# Altium PCB PCB_SciKey_2026-11-08.pcbdoc
Units mm, origin at the board's own origin, x right, y up, seen from the top; angles counter-clockwise.
Board outline 113.54 x 85.6 mm, 2 copper layers (Top Layer, Bottom Layer); 29 components, 56 nets, 93 pads, 12 vias.
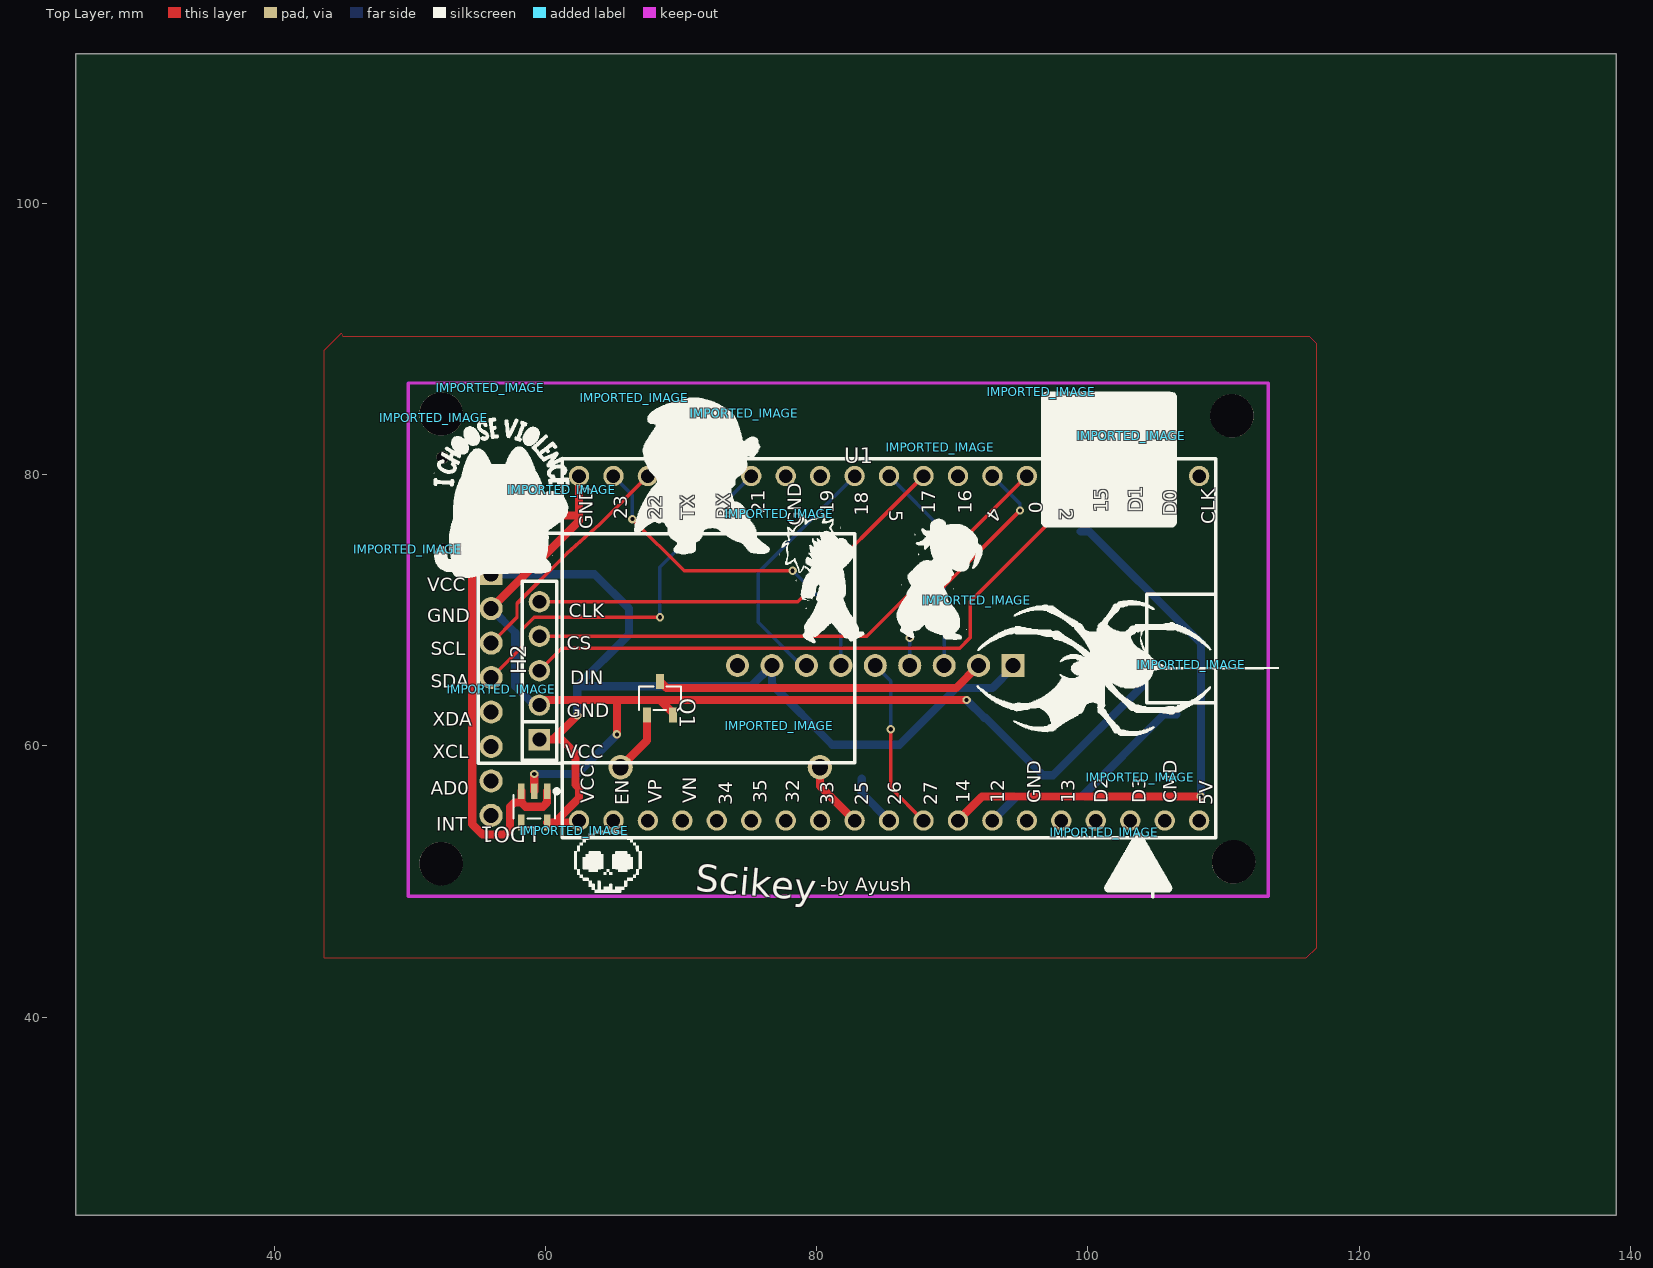
[diagram p0: Top Layer view]
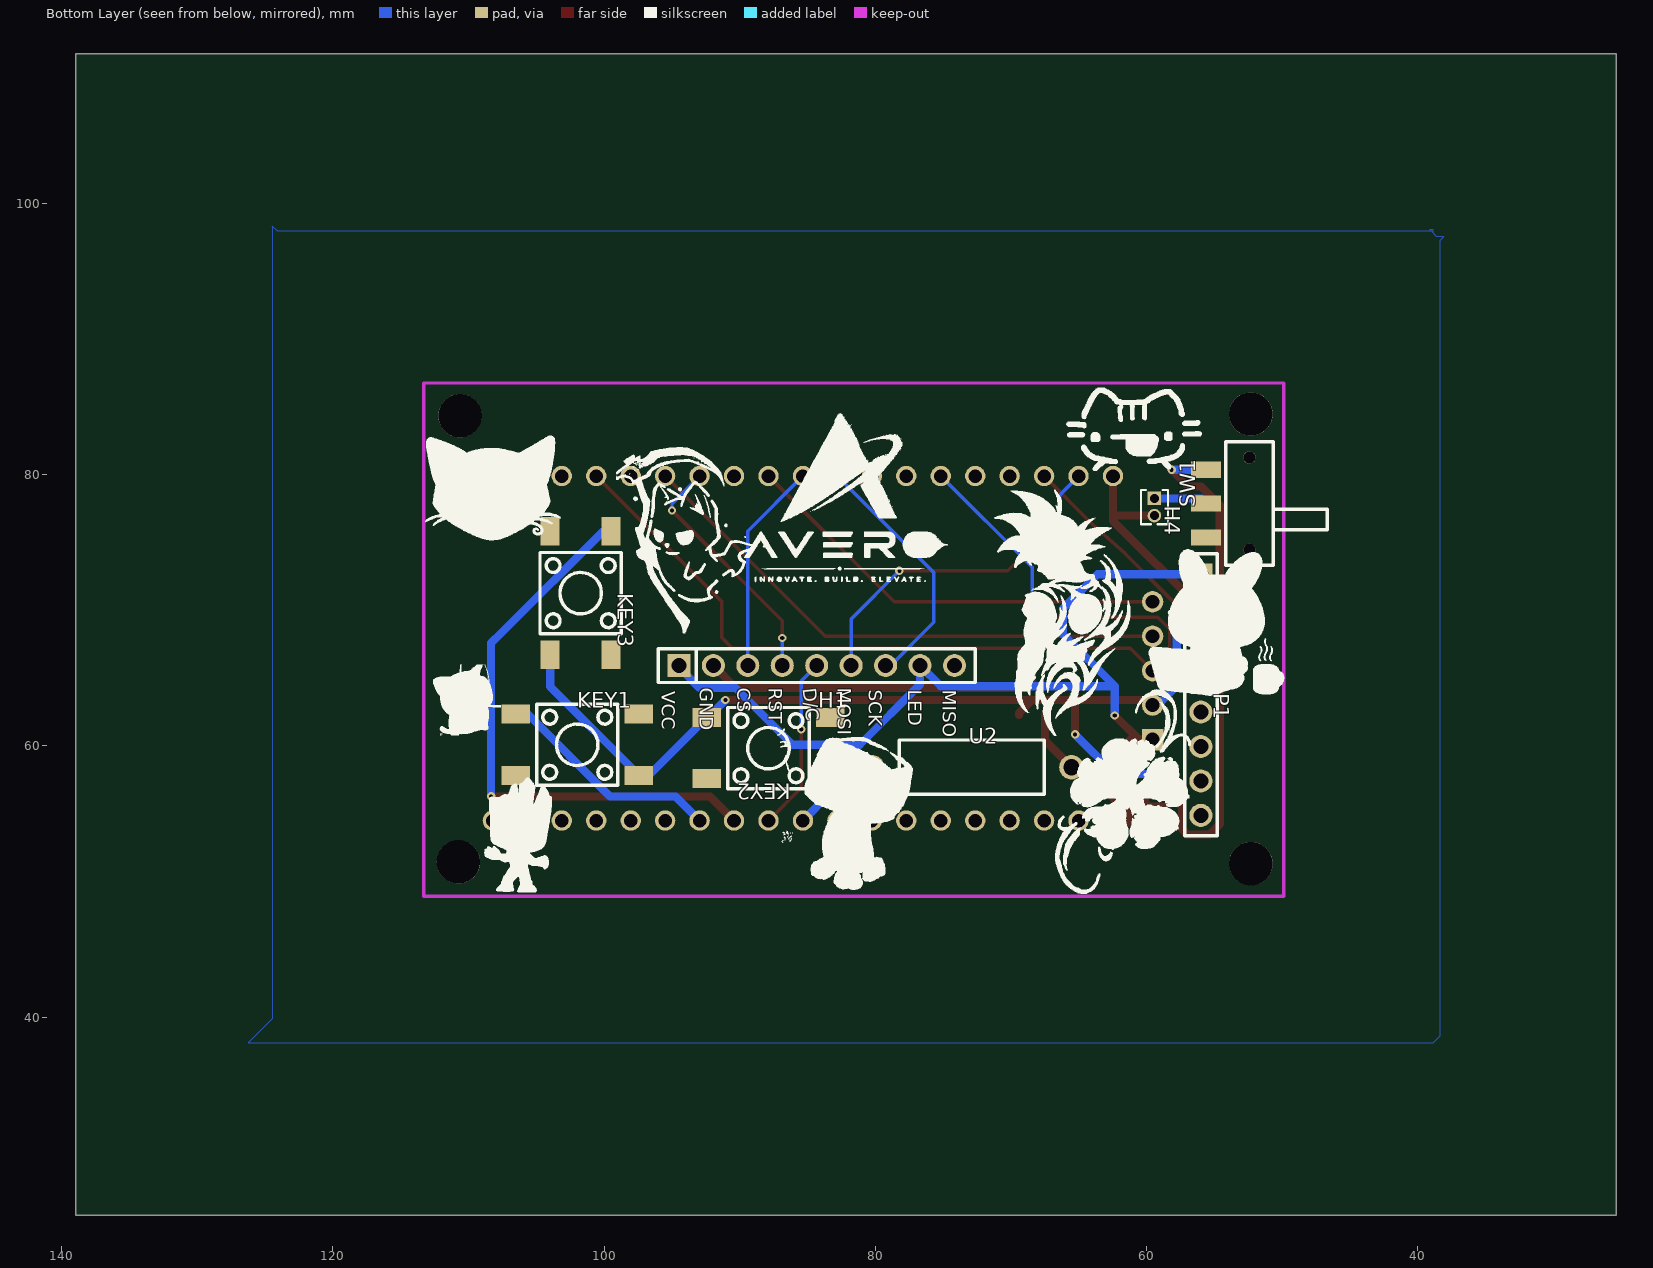
[diagram p1: Bottom Layer view, seen from below]

## Layer stack, top to bottom
Top Layer: signal copper (thickness not stored)
Dielectric: dielectric 0.32, FR-4, Dk 4.8
Bottom Layer: signal copper (thickness not stored)

## Board outline
138.938,25.4 25.4,25.4 25.4,110.998 138.938,110.998

## Components (designator, comment, footprint, x,y, rotation, side; value= is the part's Value field where it differs from the comment)
H1 "Header-Female-2.54_1x9" HDR-TH_9P-P2.54-V-F-1 84.328,65.913 r0 bottom
H2 "Header-Female-2.54_1x5" HDR-TH_5P-P2.54-V-F 59.563,65.532 r90 top
H4 "HX PZ1.27-1X2P ZZ" HDR-TH_HX-PZ1.27-1X2P-ZZ 59.436,77.597 r90 bottom
IMPORTED_IMAGE "IMPORTED_IMAGE" IMPORTED_IMAGE 74.66,84.495 r0 top
IMPORTED_IMAGE "IMPORTED_IMAGE" IMPORTED_IMAGE 61.218,78.877 r0 top
IMPORTED_IMAGE "IMPORTED_IMAGE" IMPORTED_IMAGE 89.106,81.996 r0 top
IMPORTED_IMAGE "IMPORTED_IMAGE" IMPORTED_IMAGE 103.204,82.856 r0 top
IMPORTED_IMAGE "IMPORTED_IMAGE" IMPORTED_IMAGE 55.932,86.383 r0 top
IMPORTED_IMAGE "IMPORTED_IMAGE" IMPORTED_IMAGE 56.764,64.15 r0 top
IMPORTED_IMAGE "IMPORTED_IMAGE" IMPORTED_IMAGE 49.864,74.474 r0 top
IMPORTED_IMAGE "IMPORTED_IMAGE" IMPORTED_IMAGE 77.256,61.475 r0 top
IMPORTED_IMAGE "IMPORTED_IMAGE" IMPORTED_IMAGE 107.609,65.982 r0 top
IMPORTED_IMAGE "IMPORTED_IMAGE" IMPORTED_IMAGE 103.851,57.67 r0 top
IMPORTED_IMAGE "IMPORTED_IMAGE" IMPORTED_IMAGE 91.804,70.712 r0 top
IMPORTED_IMAGE "IMPORTED_IMAGE" IMPORTED_IMAGE 77.249,77.1 r0 top
IMPORTED_IMAGE "IMPORTED_IMAGE" IMPORTED_IMAGE 51.77,84.19 r0 top
IMPORTED_IMAGE "IMPORTED_IMAGE" IMPORTED_IMAGE 96.549,86.101 r0 top
IMPORTED_IMAGE "IMPORTED_IMAGE" IMPORTED_IMAGE 66.541,85.664 r0 top
IMPORTED_IMAGE "IMPORTED_IMAGE" IMPORTED_IMAGE 62.119,53.73 r0 top
IMPORTED_IMAGE "IMPORTED_IMAGE" IMPORTED_IMAGE 101.213,53.608 r0 top
KEY1 "4PINTACTPCBTHTPUSHBUTTON" SW-SMD_4P-L6.0-W6.0-P4.50-LS10.0_TL3301EF160QG 101.981,60.071 r0 bottom
KEY2 "4PINTACTPCBTHTPUSHBUTTON" SW-SMD_4P-L6.0-W6.0-P4.50-LS10.0_TL3301EF160QG 87.884,59.817 r180 bottom
KEY3 "4PINTACTPCBTHTPUSHBUTTON" SW-SMD_4P-L6.0-W6.0-P4.50-LS10.0_TL3301EF160QG 101.727,71.247 r90 bottom
LDO1 "ME6211C33M5G-N" SOT-23-5_L3.0-W1.7-P0.95-LS2.8-BL 59.182,55.499 r180 top
P1 "Header-Female-2.54_1x8" HDR-TH_8P-P2.54-V-F 56.007,63.754 r90 bottom
Q1 "MMBT7002" SOT-23-3_L2.9-W1.6-P1.90-LS2.8-BR 68.453,63.5 r270 top
SW1 "MST-12D18G3 SURFACE MOUNT SLIDE SWITCH" SW-SMD_MST-12D18G4-SPDT-SLIDE-SWITCH 55.626,77.851 r270 bottom
U1 "ESP32-DEVKITC" BULETM-SMD_ESP32-DEVKITC 85.344,67.183 r0 top
U2 "220ohm" RES-TH_BD4.0-L10.7-P14.70-D0.8 72.898,58.42 r0 bottom

## Footprints (in the part's own frame and the unit in brackets; to place one, negate y for a bottom-side part, rotate by r counter-clockwise, add the part's x,y. Pads: shape width x height; smd on the part's side, far side on the other; paste and mask are expansions set on the pad)
BULETM-SMD_ESP32-DEVKITC [mm]
  round 1.5 hole 1 paste+0 mask+0.05: 1(-22.86,-12.7) 2(-20.32,-12.7) 3(-17.78,-12.7) 4(-15.24,-12.7) 5(-12.7,-12.7) 6(-10.16,-12.7) 7(-7.62,-12.7) 8(-5.08,-12.7) 9(-2.54,-12.7) 10(0,-12.7) 11(2.54,-12.7) 12(5.08,-12.7) 13(7.62,-12.7) 14(10.16,-12.7) 15(12.7,-12.7) 16(15.24,-12.7) 17(17.78,-12.7) 18(20.32,-12.7) 19(22.86,-12.7) 20(-22.86,12.7) 21(-20.32,12.7) 22(-17.78,12.7) 23(-15.24,12.7) 24(-12.7,12.7) 25(-10.16,12.7) 26(-7.62,12.7) 27(-5.08,12.7) 28(-2.54,12.7) 29(0,12.7) 30(2.54,12.7) 31(5.08,12.7) 32(7.62,12.7) 33(10.16,12.7) 34(12.7,12.7) 35(15.24,12.7) 36(17.78,12.7) 37(20.32,12.7) 38(22.86,12.7)
  silkscreen extent -30.3,-13.97 24.1,13.97
HDR-TH_5P-P2.54-V-F [mil]
  rect 62x62 hole 40.16 paste+0 mask+2: 1(-200,0)
  round 62 hole 40.16 paste+0 mask+2: 2(-100,0) 3(0,0) 4(100,0) 5(200,0)
  silkscreen extent -260,-50 260,50
HDR-TH_8P-P2.54-V-F [mm]
  rect 1.575x1.7 hole 1.1 paste+0 mask+0.051: 1(8.89,0)
  round 1.7 hole 1.1 paste+0 mask+0.051: 2(6.35,0) 3(3.81,0) 4(1.27,0) 5(-1.27,0) 6(-3.81,0) 7(-6.35,0) 8(-8.89,0)
  silkscreen extent -10.4,-1.2 10.4,1.2
HDR-TH_9P-P2.54-V-F-1 [mm]
  rect 1.7x1.7 hole 1.1 paste+0 mask+0.051: 1(10.16,0)
  round 1.7 hole 1.1 paste+0 mask+0.051: 2(7.62,0) 3(5.08,0) 4(2.54,0) 5(0,0) 6(-2.54,0) 7(-5.08,0) 8(-7.62,0) 9(-10.16,0)
  silkscreen extent -11.68,-1.25 11.68,1.25
HDR-TH_HX-PZ1.27-1X2P-ZZ [mm]
  rect 1x1 hole 0.65 paste+0 mask+0.05: 1(0.635,0)
  round 1 hole 0.65 paste+0 mask+0.05: 2(-0.635,0)
  silkscreen extent -1.27,-1 1.27,1
IMPORTED_IMAGE [mm]
RES-TH_BD4.0-L10.7-P14.70-D0.8 [mm]
  round 1.8 hole 1.2 paste+0 mask+0.051: 1(7.35,0) 2(-7.35,0)
  silkscreen extent -5.35,-2 5.35,2
SOT-23-3_L2.9-W1.6-P1.90-LS2.8-BR [mm]
  rect 1.07x0.6 smd paste+0 mask+0.051: 1(1.235,-0.95) 2(1.235,0.95) 3(-1.235,0)
  silkscreen extent -0.88,-1.54 0.88,1.54
SOT-23-5_L3.0-W1.7-P0.95-LS2.8-BL [mm]
  rect 0.49x1.157 smd paste+0 mask+0.051: 1(-0.95,-1.154) 2(0,-1.154) 3(0.95,-1.154)
  rect 0.49x1.175 smd paste+0 mask+0.051: 4(0.95,1.154) 5(-0.95,1.154)
  silkscreen extent -1.8,-1.29 1.53,0.85
SW-SMD_4P-L6.0-W6.0-P4.50-LS10.0_TL3301EF160QG [mm]
  rect 2.1x1.4 smd paste+0 mask+0.051: 1(4.55,-2.25) 2(-4.55,-2.25) 3(4.55,2.25) 4(-4.55,2.25)
  silkscreen extent -3,-3 3,3
SW-SMD_MST-12D18G4-SPDT-SLIDE-SWITCH [mm]
  rect 1.2x2.2 smd paste+0 mask+0.051: 1(2.5,0) 2(0,0) 3(-2.5,0)
  round 0.9 hole 0.9 unplated paste+0: ""(-3.4,3.2) ""(3.4,3.2)
  silkscreen extent -4.55,1.45 4.55,8.95

## Free pads (board coordinates)
  round 3.2 hole 3.2 unplated paste+0: ""(52.324,51.308) ""(52.324,84.455) ""(110.617,84.328) ""(110.744,51.435)

## Via types
v1: diameter 0.62, hole 0.31, Top Layer to Bottom Layer, tented both sides, 12 vias

## Nets (pads, with @x,y where several pads share a name; then routed paths per layer and width w, separated by ;. In a path a pad name is that pad's centre, name@x,y a point inside that pad or via, vN(x,y) a via of type N, cw(c..) or ccw(c..) an arc to the next point about the centre after c; other vN are vias at no path point)
BAT+: H4.1 SW1.2 | length 4
  Bottom Layer w0.6: SW1.2 56.007,78.232 H4.1
CLK: H2.5 U1.30 | length 32.2
  Top Layer w0.254: H2.5 78.613,70.612 U1.30
CS: H1.3 U1.29 | length 15.7
  Bottom Layer w0.254: U1.29 89.408,75.819 H1.3
CSM: H2.4 U1.33 | length 40.8
  Top Layer w0.254: H2.4 83.693,68.072 U1.33
D/C: H1.5 U1.11 | length 12.9
  Top Layer w0.254: v1(85.471,61.214) 85.471,56.896 U1.11
  Bottom Layer w0.254: H1.5 85.471,64.77 v1(85.471,61.214)
DIN: H2.3 U1.35 | length 48.5
  Top Layer w0.254: H2.3 61.214,67.183 90.551,67.183 91.313,67.945 91.313,70.612 U1.35
GND: H2.2 H4.2 KEY1.4 KEY2.4 KEY3.4 LDO1.2 P1.2 Q1.2 U1.20 | length 88.8
  Top Layer w0.6: P1.2 62.484,76.581 U1.20 ; LDO1.2 v1(59.182,57.912) ; H4.2 62.484,76.962 ; H2.2 59.944,63.373 68.453,63.373 ; v1(65.278,60.833) 65.278,63.373 ; Q1.2 69.403,62.423 68.453,63.373 ; v1(91.059,63.373) 68.453,63.373
  Bottom Layer w0.6: P1.2 57.785,68.326 57.785,64.389 59.182,62.992 H2.2 ; v1(59.182,57.912) 62.357,57.912 v1(65.278,60.833) ; v1(91.059,63.373) 92.365,62.067 KEY2.4 96.68,57.821 KEY1.4 103.977,64.367 KEY3.4
H1_9: H1.9
KEY1_2: KEY1.2
KEY1_3: KEY1.3
KEY2_2: KEY2.2
KEY2_3: KEY2.3
KEY3_2: KEY3.2
KEY3_3: KEY3.3
LDO1_4: LDO1.4
MOSI: H1.6 U1.21 | length 25.6
  Top Layer w0.254: v1(66.421,76.708) 70.231,72.898 v1(78.232,72.898)
  Bottom Layer w0.254: U1.21 66.421,78.486 v1(66.421,76.708) ; v1(78.232,72.898) 81.788,69.342 H1.6
P1_5: P1.5
P1_6: P1.6
P1_7: P1.7
P1_8: P1.8
Q1_1: Q1.1 U2.2 | length 4.7
  Top Layer w0.6: U2.2 67.503,60.375 Q1.1
RST: H1.4 U1.32 | length 18.2
  Top Layer w0.254: v1(86.868,67.945) 86.868,69.215 v1(94.996,77.343)
  Bottom Layer w0.254: H1.4 v1(86.868,67.945) ; U1.32 94.996,77.851 v1(94.996,77.343)
S$2710: 
SCK: H1.7 U1.28 | length 18.6
  Bottom Layer w0.254: H1.7 78.867,65.913 75.692,69.088 75.692,72.771 U1.28
SCL: P1.3 U1.22 | length 17.2
  Top Layer w0.254: P1.3 57.912,69.469 57.912,70.485 61.595,74.168 64.008,76.327 U1.22
SDA: P1.4 U1.25 | length 28.2
  Top Layer w0.254: P1.4 58.293,67.31 58.293,68.58 59.182,69.469 v1(68.453,69.469)
  Bottom Layer w0.254: v1(68.453,69.469) 68.453,73.152 U1.25
SW1: KEY1.1 U1.13 | length 16.8
  Bottom Layer w0.6: U1.13 94.742,56.261 99.568,56.261 105.628,62.321 KEY1.1
SW1_1: SW1.1
SW2: KEY2.1 U1.10 | length 3.9
  Bottom Layer w0.6: KEY2.1 83.334,56.493 U1.10
SW3: KEY3.1 U1.12 | length 42.2
  Top Layer w0.6: U1.12 92.202,56.261 v1(108.331,56.261)
  Bottom Layer w0.6: KEY3.1 100.098,75.797 107.569,68.326 108.331,67.564 v1(108.331,56.261)
TFT-: H1.2 Q1.3 | length 24.4
  Top Layer w0.6: Q1.3 68.926,64.262 90.297,64.262 H1.2
TFT_SW: U1.9 U2.1 | length 5
  Top Layer w0.6: U2.1 80.248,57.039 U1.9
U1_2: U1.2
U1_3: U1.3
U1_4: U1.4
U1_5: U1.5
U1_6: U1.6
U1_7: U1.7
U1_8: U1.8
U1_14: U1.14
U1_15: U1.15
U1_16: U1.16
U1_17: U1.17
U1_18: U1.18
U1_19: U1.19
U1_23: U1.23
U1_24: U1.24
U1_26: U1.26
U1_27: U1.27
U1_31: U1.31
U1_34: U1.34
U1_36: U1.36
U1_37: U1.37
U1_38: U1.38
VCC: H1.1 H1.8 H2.1 LDO1.5 P1.1 U1.1 | length 74.7
  Top Layer w0.6: v1(62.357,62.23) 60.579,60.452 H2.1 61.214,60.452 62.23,59.436 62.23,57.15 62.484,56.896 62.484,56.134 60.696,54.346 LDO1.5 62.346,54.345 U1.1
  Bottom Layer w0.6: P1.1 63.627,72.644 66.167,70.104 66.167,68.199 62.357,64.389 ; v1(62.357,62.23) 62.357,64.389 ; H1.1 94.488,65.786 92.964,64.262 90.297,64.262 86.106,60.071 81.153,60.071 76.708,64.516 H1.8 75.184,64.389 62.357,64.389
VIN: LDO1.1 LDO1.3 SW1.3 | length 40.4
  Top Layer w0.6: v1(58.166,80.351) 56.937,79.121 56.007,79.121 54.61,77.724 54.61,54.229 55.372,53.467 57.023,53.467 57.404,53.848 57.404,55.499 57.719,55.814 58.232,55.814 ; LDO1.3 58.232,55.814 ; LDO1.1 60.132,55.814 59.817,55.499 58.547,55.499 58.232,55.814
  Bottom Layer w0.6: SW1.3 v1(58.166,80.351)
pads on no net: SW1.

## Polygon pours and split planes (outlines as drawn)
GND on Bottom Layer (solid): 124.46,39.878 126.238,38.1 38.862,38.1 38.354,38.608 38.354,97.282 38.1,97.536 38.608,97.536 38.989,97.917 38.862,97.917 38.862,98.044 39.116,98.044 38.989,97.917 124.079,97.917 124.46,98.298 124.46,39.878
GND on Top Layer (solid): 45.085,90.17 116.332,90.17 116.84,89.662 116.84,45.085 116.078,44.323 43.688,44.323 43.688,89.154 44.958,90.424

## Silkscreen, mask and mechanical layers (free items; w line width, h text height)
Top Overlay:
  text "0" at 95.639,77.978 h1 r270
  text "4" at 92.94,77.637 h1 r234
  text "2" at 97.925,77.47 h1 r270
  text "5" at 85.352,77.343 h1 r270
  text "15" at 101.465,77.216 h1 r90
  text "D1" at 104.005,77.216 h1 r90
  text "21" at 76.192,77.089 h1 r90
  text "19" at 81.272,77.089 h1 r90
  text "17" at 88.765,77.089 h1 r90
  text "16" at 91.432,77.089 h1 r90
  text "18" at 83.812,76.962 h1 r90
  text "D0" at 106.545,76.962 h1 r90
  text "23" at 66.032,76.708 h1 r90
  text "22" at 68.572,76.708 h1 r90
  text "TX" at 70.985,76.708 h1 r90
  text "RX" at 73.652,76.708 h1 r90
  text "CLK" at 109.339,76.327 h1 r90
  text "GND" at 78.859,76.2 h1 r90
  text "GND" at 63.492,75.946 h1 r90
  text "VCC" at 51.308,71.382 h1
  text "CLK" at 61.722,69.477 h1
  text "GND" at 51.308,69.096 h1
  text "CS" at 61.595,67.064 h1
  text "SCL" at 51.562,66.683 h1
  text "DIN" at 61.849,64.524 h1
  text "SDA" at 51.562,64.27 h1
  text "GND" at 61.595,62.111 h1
  text "XDA" at 51.689,61.476 h1
  text "XCL" at 51.689,59.063 h1
  text "VCC" at 61.468,59.063 h1
  text "AD0" at 51.562,56.396 h1
  text "VCC" at 63.619,55.753 h1 r90
  text "VP" at 68.572,55.753 h1 r90
  text "VN" at 71.112,55.753 h1 r90
  text "35" at 76.319,55.753 h1 r90
  text "32" at 78.732,55.753 h1 r90
  text "14" at 91.305,55.753 h1 r90
  text "12" at 93.845,55.753 h1 r90
  text "GND" at 96.512,55.753 h1 r90
  text "13" at 99.052,55.753 h1 r90
  text "D2" at 101.465,55.753 h1 r90
  text "D3" at 104.259,55.753 h1 r90
  text "CMD" at 106.545,55.753 h1 r90
  text "EN" at 66.159,55.626 h1 r90
  text "34" at 73.779,55.626 h1 r90
  text "33" at 81.272,55.626 h1 r90
  text "25" at 83.812,55.626 h1 r90
  text "26" at 86.225,55.626 h1 r90
  text "27" at 88.892,55.626 h1 r90
  text "5V" at 109.212,55.626 h1 r90
  text "INT" at 51.943,53.729 h1
  text "Scikey" at 71.033,49.296 h2 r355
  text "-by Ayush" at 80.264,49.284 h1
Bottom Overlay:
  text "MOSI" at 82.792,64.262 h1 r90
  text "RST" at 87.872,64.262 h1 r90
  text "CS" at 90.175,64.262 h1 r90
  text "GND" at 92.956,64.262 h1 r90
  text "D/C" at 85.364,64.21 h1 r84
  text "MISO" at 75.049,64.135 h1 r90
  text "LED" at 77.589,64.135 h1 r90
  text "SCK" at 80.51,64.135 h1 r90
  text "VCC" at 95.75,64.008 h1 r90